# Altium PCB DB31.PcbDoc (part 7 of 8)
Units mil, origin at the board's own origin, x right, y up, seen from the top; angles counter-clockwise.
Board outline 3236.22 x 4456.69 mil, 8 copper layers (Top Layer, MidLayer1, MidLayer2, GND-Layer5, MidLayer3, VCC, MidLayer4, Bottom Layer), stack 61.8 mil thick; 226 components, 469 nets, 1815 pads, 1562 vias.
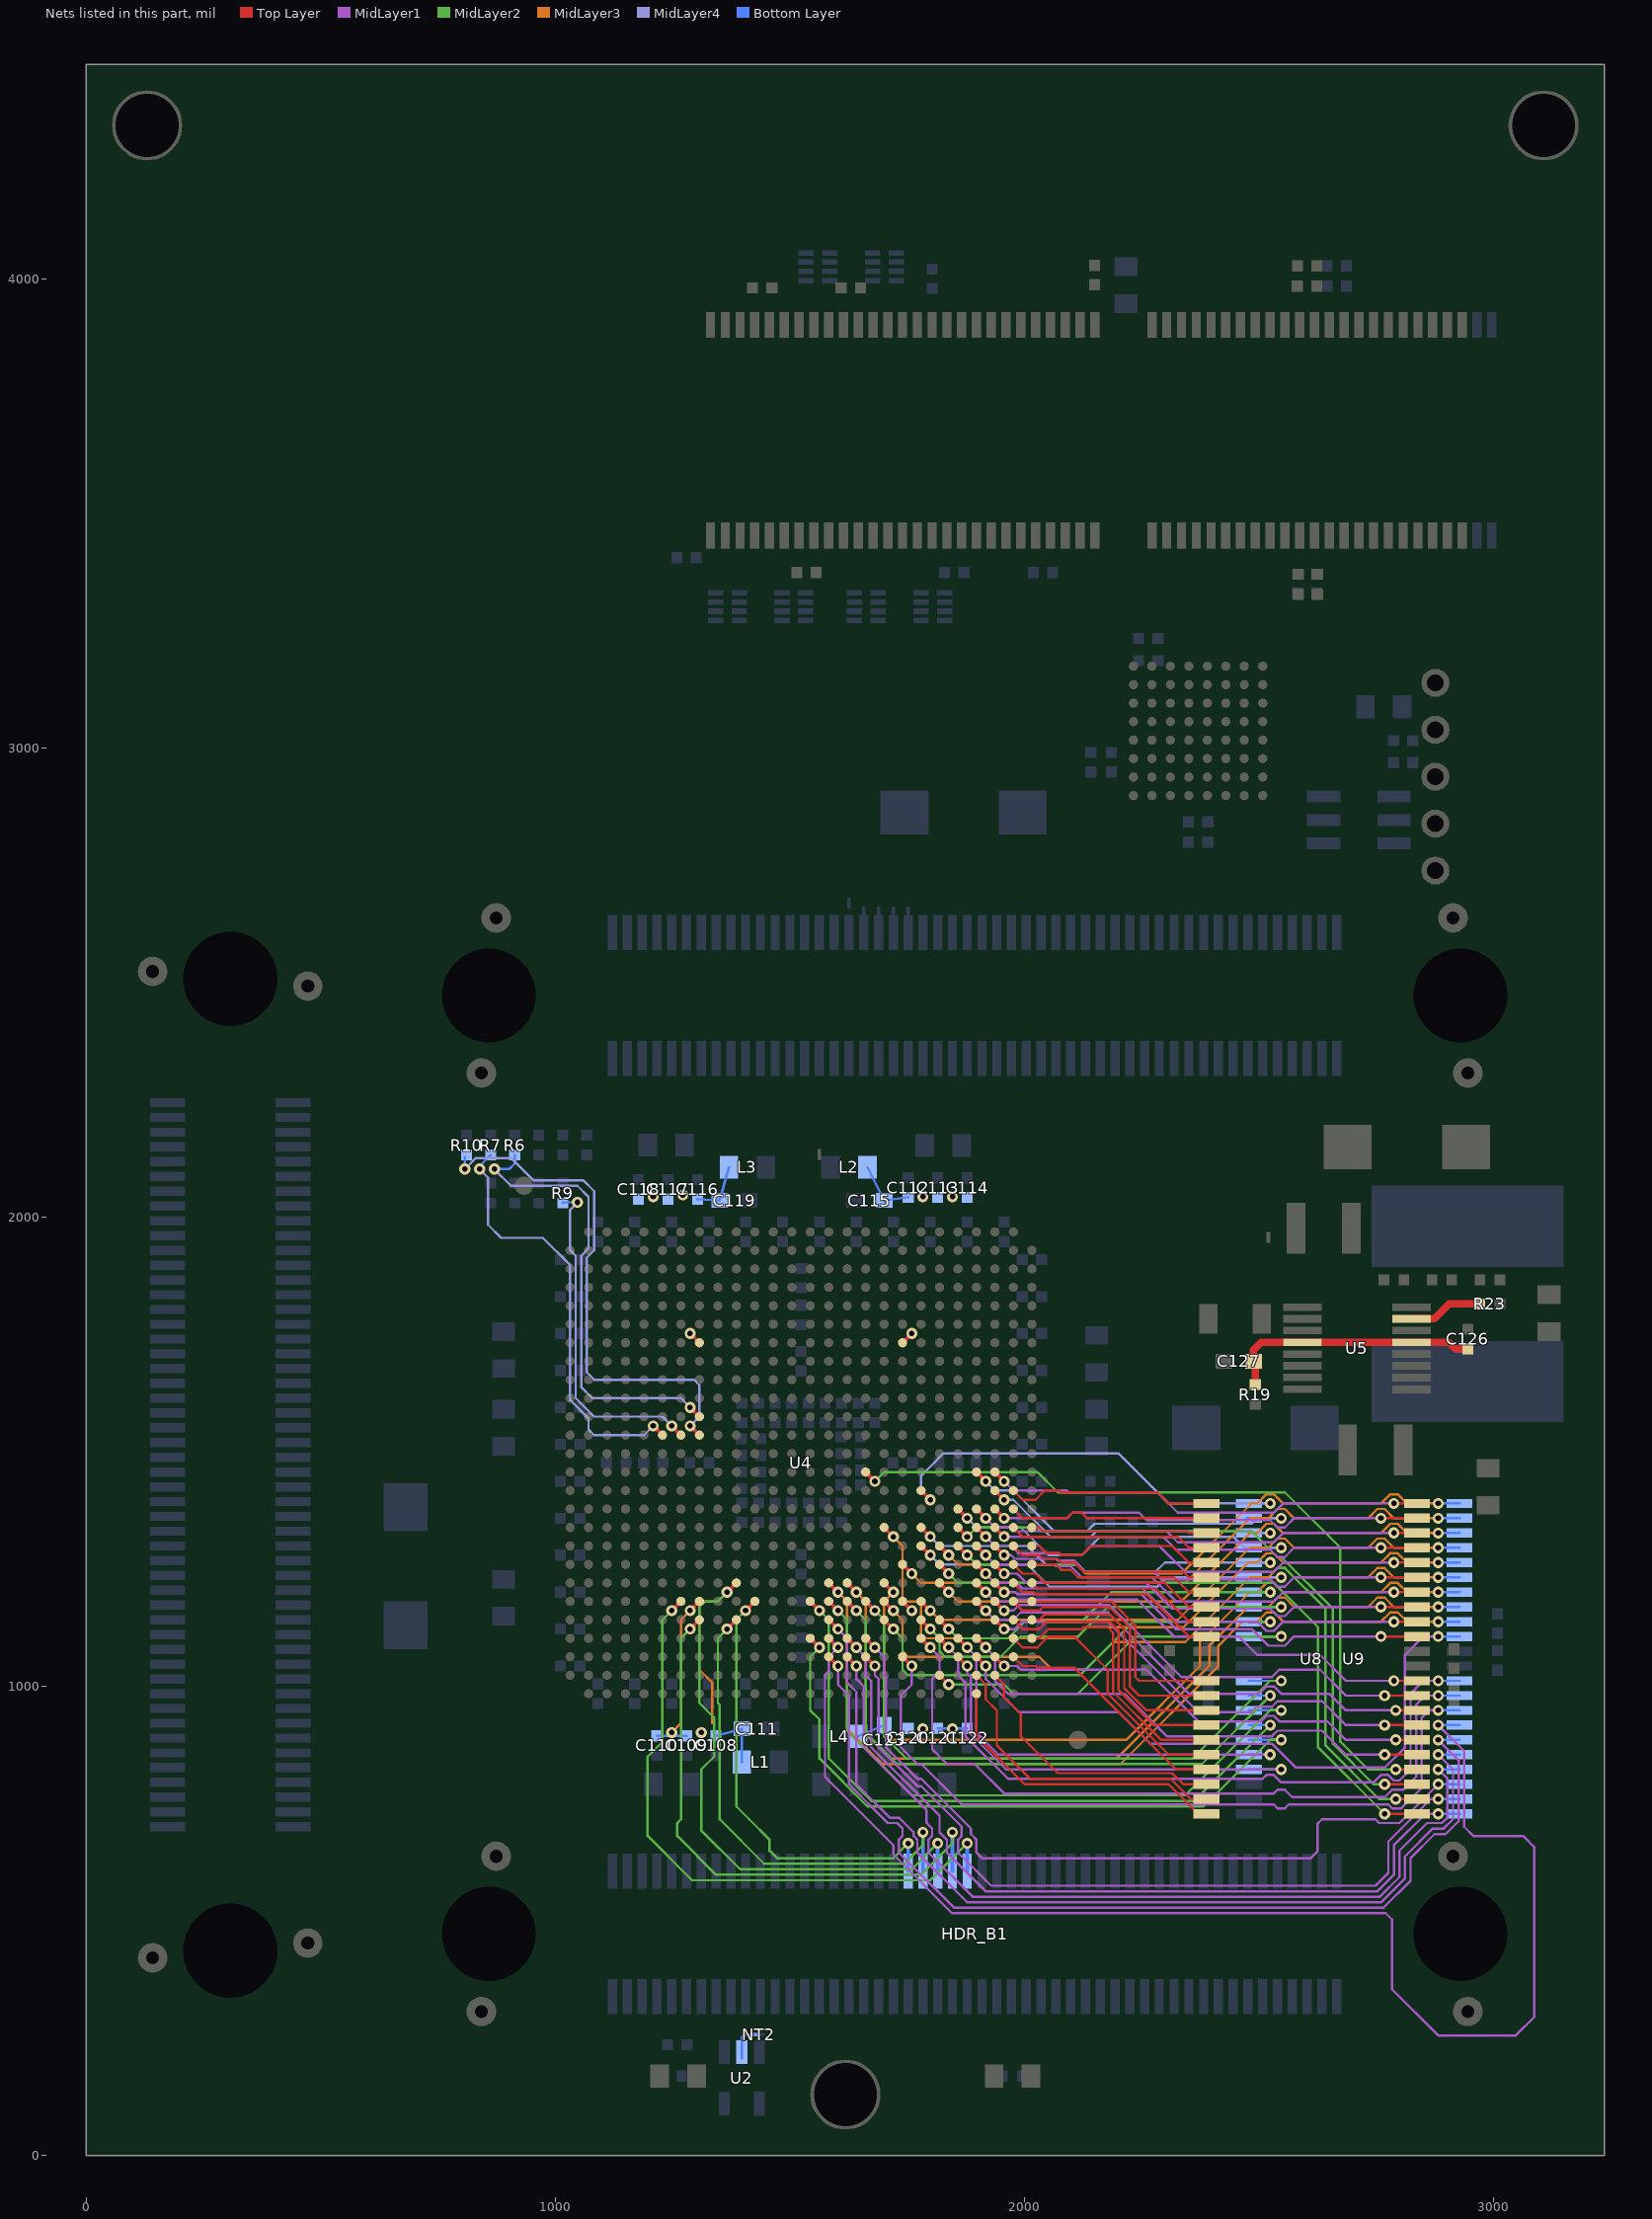
[diagram p13: the nets of this part, all layers, seen from the top]

## Via types
v1: diameter 23.62, hole 11.81, Top Layer to Bottom Layer, 947 vias
v2: diameter 23.62, hole 11.81, Top Layer to Bottom Layer, tented both sides, 476 vias
v3: diameter 27.56, hole 15.75, Top Layer to Bottom Layer, 138 vias
v4: diameter 23.62, hole 11.81, Top Layer to Bottom Layer, tented top, 1 vias

## Nets (pads, with @x,y where several pads share a name; then routed paths per layer and width w, separated by ;. In a path a pad name is that pad's centre, name@x,y a point inside that pad or via, vN(x,y) a via of type N, cw(c..) or ccw(c..) an arc to the next point about the centre after c; other vN are vias at no path point) (continued)
SRAM1_A3: U4.AD22 U9.4 | length 938
  Top Layer w7.87: U4.AD22@1858.27,1062.99 v1(1877.95,1043.3)
  MidLayer1 w5: v1(1877.95,1043.3) 1877.95,1027.56 1885.83,1019.68 1885.83,921.26 1885.83,909.45 1885.83,897.64 1960.63,822.83 v1(2547.24,822.83)
  Bottom Layer w5: U9.4@2478.44,822.83 v1(2547.24,822.83)
SRAM1_A4: U4.AC22 U9.5 | length 907.8
  Top Layer w7.87: U4.AC22@1858.27,1102.36 v1(1877.96,1082.67)
  MidLayer1 w5: v1(1877.96,1082.67) 1897.64,1062.99 1897.64,921.26 1897.64,909.45 1897.64,901.57 1944.88,854.33 v1(2523.62,854.33)
  Bottom Layer w5: U9.5@2478.44,854.32 v1(2523.62,854.33)
SRAM1_A5: U4.U20 U9.18 | length 840.9
  Top Layer w7.87: U4.U20@1779.53,1338.58 v1(1799.22,1318.9)
  MidLayer4 w5: v1(1799.22,1318.9) 1818.9,1299.21 2005.91,1299.21 2045.27,1259.84 2078.74,1259.84 2090.55,1259.84 2114.17,1259.84 2129.92,1244.09 2279.53,1244.09 2299.2,1263.77 v1(2523.83,1263.77)
  Bottom Layer w5: U9.18@2478.44,1263.77 v1(2523.83,1263.77) v1@2527.77,1263.77
SRAM1_A6: U4.T22 U9.19 | length 828.6
  Top Layer w7.87: U4.T22@1858.27,1377.95 v1(1877.96,1358.27)
  MidLayer4 w5: v1(1877.96,1358.27) 1897.64,1338.58 1992.13,1338.58 2051.18,1279.53 2078.74,1279.53 2090.55,1279.53 2122.05,1279.53 2161.42,1318.9 2444.88,1318.9 2468.5,1295.28 v1(2547.24,1295.28)
  Bottom Layer w5: U9.19@2478.44,1295.27 v1(2547.24,1295.28) v1@2551.18,1295.28
SRAM1_A7: U4.R24 U9.20 | length 683.4
  Top Layer w7.87: U4.R24@1937.01,1417.32 v1(1956.7,1397.64)
  MidLayer4 w5: v1(1956.7,1397.64) 1976.38,1397.64 2055.12,1318.9 2078.74,1318.9 2090.55,1318.9 2141.73,1318.9 2153.54,1330.71 2484.25,1330.71 2488.2,1326.76 v1(2523.83,1326.76)
  Bottom Layer w5: U9.20@2478.44,1326.76 v1(2523.83,1326.76) v1@2527.77,1326.76
SRAM1_A8: U4.P23 U9.21 | length 791.9
  Top Layer w7.87: U4.P23@1897.64,1456.69 v1(1917.33,1437.01)
  MidLayer4 w5: v1(1917.33,1437.01) 1937.01,1417.32 1976.38,1417.32 2062.99,1330.71 2078.74,1330.71 2090.55,1330.71 2133.86,1330.71 2149.61,1346.46 2484.25,1346.46 2496.06,1358.27 v1(2547.24,1358.27)
  Bottom Layer w5: U9.21@2472.44,1358.27 U9.21@2478.44,1358.26 v1(2547.24,1358.27) v1@2551.18,1358.27
SRAM1_A9: U4.R20 U9.22 | length 940.5
  Top Layer w7.87: U4.R20@1779.53,1417.32 v1(1799.22,1397.64)
  MidLayer4 w5: v1(1799.22,1397.64) 1779.53,1417.32 1779.53,1448.82 1826.77,1496.06 2078.74,1496.06 2090.55,1496.06 2200.79,1496.06 2307.1,1389.75 v1(2523.83,1389.75)
  Bottom Layer w5: U9.22@2478.44,1389.75 v1(2523.83,1389.75)
SRAM1_A10: U4.V21 U9.23 | length 1229.9
  Top Layer w7.87: U4.V21@1818.9,1299.21 v1(1838.59,1279.53)
  MidLayer3 w5: v1(1838.59,1279.53) 1858.27,1259.84 2078.74,1259.84 2090.55,1259.84 2110.24,1259.84 2129.92,1240.16 2334.65,1240.16 2480.33,1385.84 2480.33,1389.75 2496.27,1389.75 2515.96,1409.44 2531.7,1409.44 2551.38,1389.76 ; 2551.18,1389.76 2551.38,1389.76 ; v1(2881.9,1389.75) 2814.97,1389.75 2795.28,1409.45 2779.53,1409.45 2759.84,1389.76 2551.38,1389.76
  Bottom Layer w5: v1(2881.9,1389.75) U9.23@2927.25,1389.75
SRAM1_A11: U4.W19 U9.24 | length 1292.8
  Top Layer w7.87: U4.W19@1740.16,1259.84 v1(1759.84,1240.16)
  MidLayer3 w5: v1@1760.03,1239.97 1779.53,1220.47 2078.74,1220.47 2090.55,1220.47 2342.52,1220.47 2480.31,1358.27 2519.69,1358.27 2539.37,1377.95 2555.12,1377.95 2574.8,1358.27 2732.28,1358.27 2751.97,1377.95 2767.72,1377.95 2787.41,1358.26 v1(2881.9,1358.26)
  Bottom Layer w5: v1(2881.9,1358.26) U9.24@2927.25,1358.26
SRAM1_A12: U4.Y21 U9.25 | length 1217.6
  Top Layer w7.87: U4.Y21@1818.9,1220.47 v1(1838.58,1200.78)
  MidLayer3 w5: v1(1838.58,1200.78) 1858.27,1181.1 2078.74,1181.1 2090.55,1181.1 2334.67,1181.1 2480.33,1326.76 2496.27,1326.76 2515.96,1346.45 2531.7,1346.45 2551.38,1326.77 2759.84,1326.77 2779.53,1346.46 2795.28,1346.46 2814.97,1326.76 v1(2881.9,1326.76)
  Bottom Layer w5: v1(2881.9,1326.76) U9.25@2927.25,1326.76
SRAM1_A13: U4.AA20 U9.26 | length 1260.3
  Top Layer w7.87: U4.AA20@1779.53,1181.1 v1(1799.22,1161.41)
  MidLayer3 w5: v1(1799.22,1161.41) 1818.9,1141.73 2078.74,1141.73 2090.55,1141.73 2326.77,1141.73 2480.31,1295.28 2519.69,1295.28 2539.37,1314.96 2555.12,1314.96 2574.8,1295.28 2732.28,1295.28 2751.97,1314.96 2767.72,1314.96 2787.41,1295.27 v1(2881.9,1295.27)
  Bottom Layer w5: v1(2881.9,1295.27) U9.26@2927.25,1295.27
SRAM1_A14: U4.U18 U9.27 | length 1525.3
  Top Layer w7.87: U4.U18@1700.79,1338.58 v1(1720.47,1318.9)
  MidLayer3 w5: v1(1720.47,1318.9) 1740.16,1299.21 1740.16,1188.98 1748.03,1181.1 1771.65,1181.1 1779.53,1173.23 1779.53,1110.24 1787.4,1102.36 2078.74,1102.36 2090.55,1102.36 2110.24,1102.36 2133.86,1125.98 2338.58,1125.98 2476.37,1263.77 2496.27,1263.77 2515.96,1283.45 2531.7,1283.45 2551.38,1263.78 2759.84,1263.78 2779.53,1283.46 2795.28,1283.46 2814.97,1263.77 v1(2881.9,1263.77)
  Bottom Layer w5: v1(2881.9,1263.77) U9.27@2927.25,1263.77
SRAM1_A15: U4.AC17 U9.42 | length 1700
  Top Layer w7.87: U4.AC17@1661.42,1102.36 v1(1681.1,1082.67)
  MidLayer1 w5: v1(1681.1,1082.67) 1700.79,1062.99 1700.79,1023.62 1704.72,1019.68 1704.72,921.26 1704.72,909.45 1704.72,870.08 1771.65,803.15 1779.53,803.15 1885.83,696.85 1885.83,685.04 1897.64,673.23 1897.64,645.67 1909.45,633.86 2610.24,633.86 2624.26,647.88 2624.26,706.94 2633.86,716.54 2748.03,716.54 2755.91,708.66 2799.21,708.66 v1(2881.9,791.33)
  Bottom Layer w5: v1(2881.9,791.33) U9.42@2927.25,791.33
SRAM1_A16: U4.AD17 U9.43 | length 1724
  Top Layer w7.87: U4.AD17@1661.42,1062.99 v1(1681.1,1043.3)
  MidLayer1 w5: v1(1681.1,1043.3) 1681.1,1023.62 1688.98,1015.75 1688.98,921.26 1688.98,909.45 1688.98,870.08 1771.65,787.4 1779.53,787.4 1866.14,700.79 1866.14,681.1 1858.27,673.23 1858.27,645.67 1928.89,575.05 2748.28,575.05 2775.59,602.36 2775.59,669.29 2866.13,759.83 v1(2881.9,759.83)
  Bottom Layer w5: v1(2881.9,759.83) U9.43@2927.25,759.83
SRAM1_A17: U4.AC16 U9.44 | length 1776.8
  Top Layer w7.87: U4.AC16@1622.05,1102.36 v1(1641.73,1082.67)
  MidLayer1 w5: v1(1641.73,1082.67) 1661.42,1062.99 1661.42,1023.62 1673.23,1011.81 1673.23,921.26 1673.23,909.45 1673.23,870.08 1818.9,724.41 1818.9,688.98 1834.65,673.23 1834.65,645.67 1917.08,563.24 2752.21,563.24 2787.4,598.43 2787.4,661.42 2854.32,728.34 v1(2881.9,728.34)
  Bottom Layer w5: v1(2881.9,728.34) U9.44@2927.25,728.34
SRAM1_A18: U4.AA18 U9.28 | length 1440.2
  Top Layer w7.87: U4.AA18@1700.79,1181.1 v1(1720.47,1161.41)
  MidLayer3 w5: v1(1720.47,1161.41) 1740.16,1141.73 1740.16,1074.8 1751.97,1062.99 2031.5,1062.99 2059.05,1035.43 2078.74,1035.43 2090.55,1035.43 2129.92,1035.43 2188.98,1094.49 2342.52,1094.49 2480.31,1232.28 2519.69,1232.28 2539.37,1251.97 2555.12,1251.97 2574.8,1232.28 2732.28,1232.28 2751.97,1251.97 2767.72,1251.97 2787.41,1232.28 v1(2881.9,1232.27)
  Bottom Layer w5: v1(2881.9,1232.27) U9.28@2927.25,1232.27
SRAM1_D0: U4.AA14 U9.7 | length 1445.8
  Top Layer w7.87: U4.AA14@1543.31,1181.1 v1(1562.99,1161.41)
  MidLayer2 w5: v1(1562.99,1161.41) 1582.68,1141.73 1582.68,921.26 1582.68,909.45 1582.68,846.46 1673.23,755.91 2362.2,755.91 2523.6,917.3 v1(2523.83,917.3)
  Bottom Layer w5: U9.7@2478.44,917.31 v1(2523.83,917.3) v1@2527.77,917.3
SRAM1_D1: U4.AA15 U9.8 | length 1421.9
  Top Layer w7.87: U4.AA15@1582.68,1181.1 v1(1602.36,1161.41)
  MidLayer2 w5: v1(1602.36,1161.41) 1622.05,1141.73 1622.05,921.26 1622.05,909.45 1622.05,905.51 1759.84,767.72 2342.52,767.72 2523.62,948.82 v1(2547.24,948.82)
  Bottom Layer w5: U9.8@2478.44,948.81 v1(2547.24,948.82) v1@2551.18,948.82
SRAM1_D2: U4.AA16 U9.9 | length 1295.9
  Top Layer w7.87: U4.AA16@1622.05,1181.1 v1(1641.73,1161.41)
  MidLayer2 w5: v1(1641.73,1161.41) 1661.42,1141.73 1661.42,921.26 1661.42,909.45 1661.42,901.57 1728.35,834.65 2378.17,834.65 v1(2523.83,980.31) v1@2523.61,980.31
  Bottom Layer w5: U9.9@2478.44,980.31 v1(2523.83,980.31) v1@2527.77,980.31
SRAM1_D3: U4.AA17 U9.10 | length 1311
  Top Layer w7.87: U4.AA17@1661.42,1181.1 v1(1681.1,1161.41)
  MidLayer2 w5: v1(1681.1,1161.41) 1700.79,1141.73 1700.79,921.26 1700.79,909.45 1700.79,893.7 1748.03,846.46 2358.27,846.46 2523.62,1011.81 v1(2547.24,1011.81)
  Bottom Layer w5: U9.10@2478.44,1011.8 v1(2547.24,1011.81) v1@2551.18,1011.81
SRAM1_D4: U4.AE21 U9.13 | length 868
  Top Layer w5: U4.AE21@1818.9,1023.62 v1(1838.58,1003.94)
  MidLayer2 w5: v1(1838.58,1003.94) 1956.69,1003.94 1976.38,984.25 2078.74,984.25 2090.55,984.25 2114.17,984.25 2236.22,1106.3 v1(2547.24,1106.3)
  Bottom Layer w5: U9.13@2478.44,1106.29 v1(2547.24,1106.3) v1@2551.18,1106.3
SRAM1_D5: U4.AB18 U9.14 | length 1007.8
  Top Layer w7.87: U4.AB18@1700.79,1141.73 v1(1720.47,1122.04)
  MidLayer2 w5: v1(1720.47,1122.04) 1740.16,1102.36 1740.16,1035.43 1751.97,1023.62 2078.74,1023.62 2090.55,1023.62 2118.11,1023.62 2232.27,1137.79 v1(2523.83,1137.79)
  Bottom Layer w5: U9.14@2478.44,1137.79 v1(2523.83,1137.79) v1@2527.77,1137.79
SRAM1_D6: U4.AB20 U9.15 | length 933.2
  Top Layer w7.87: U4.AB20@1779.53,1141.73 v1(1799.21,1122.04)
  MidLayer2 w5: v1(1799.21,1122.04) 1818.9,1102.36 1818.9,1074.8 1830.71,1062.99 1948.82,1062.99 1992.13,1106.3 2078.74,1106.3 2090.55,1106.3 2114.17,1106.3 2177.17,1169.29 v1(2547.24,1169.29)
  Bottom Layer w5: U9.15@2478.44,1169.28 v1(2547.24,1169.29) v1@2551.18,1169.29
SRAM1_D7: U4.AB21 U9.16 | length 811.3
  Top Layer w7.87: U4.AB21@1818.9,1141.73 v1(1838.58,1122.04)
  MidLayer2 w5: v1(1838.58,1122.04) 1858.27,1102.36 1964.57,1102.36 2000,1137.8 2078.74,1137.8 2090.55,1137.8 2122.05,1137.8 2185.04,1200.79 v1@2523.83,1200.79
  Bottom Layer w5: U9.16@2478.44,1200.78 v1(2523.83,1200.78) v1@2527.77,1200.78
SRAM1_D8: U4.Y18 U9.29 | length 1765.9
  Top Layer w7.87: U4.Y18@1700.79,1220.47 v1(1720.47,1200.78)
  MidLayer3 w5: v1(1720.47,1200.78) 1700.79,1181.1 1700.79,921.26 1700.79,909.45 1700.79,893.7 1708.66,885.83 2216.54,885.83 2374.02,1043.31 2374.02,1094.49 2480.3,1200.78 2496.27,1200.78 2515.96,1220.46 2531.7,1220.46 2551.38,1200.79 2759.84,1200.79 2779.53,1220.47 2795.28,1220.47 2814.97,1200.78 v1(2881.9,1200.78)
  Bottom Layer w5: v1(2881.9,1200.78) U9.29@2927.25,1200.78
SRAM1_D9: U4.Y16 U9.30 | length 1817.9
  Top Layer w7.87: U4.Y16@1622.05,1220.47 v1(1641.73,1200.78)
  MidLayer3 w5: v1(1641.73,1200.78) 1661.42,1181.1 1661.42,921.26 1661.42,909.45 1661.42,897.64 1712.6,846.46 2196.85,846.46 2393.7,1043.31 2393.7,1086.61 2476.38,1169.29 2519.69,1169.29 2539.37,1188.98 2555.12,1188.98 2574.8,1169.29 2732.28,1169.29 2751.97,1188.98 2767.72,1188.98 2787.41,1169.29 v1(2881.9,1169.28)
  Bottom Layer w5: v1(2881.9,1169.28) U9.30@2927.25,1169.28
SRAM1_D10: U4.Y15 U9.31 | length 1847.1
  Top Layer w7.87: U4.Y15@1582.68,1220.47 v1(1602.36,1200.78)
  MidLayer3 w5: v1(1602.36,1200.78) 1622.05,1181.1 1622.05,921.26 1622.05,909.45 1696.85,834.65 2204.72,834.65 2413.39,1043.31 2413.39,1086.61 2464.56,1137.79 2496.27,1137.79 2515.96,1157.47 2531.7,1157.47 2551.38,1137.8 2759.84,1137.8 2779.53,1157.48 2795.28,1157.48 2814.97,1137.79 v1(2881.9,1137.79)
  Bottom Layer w5: v1(2881.9,1137.79) U9.31@2927.25,1137.79
SRAM1_D11: U4.AD23 U9.32 | length 1379
  Top Layer w7.87: U4.AD23@1897.64,1062.99 v1(1917.33,1043.3)
  MidLayer1 w5: v1(1917.33,1043.3) 1917.33,1015.75 1988.19,944.88 2078.74,944.88 2090.55,944.88 2200.79,944.88 2267.72,877.95 2527.56,877.95 2578.75,826.76 2767.71,826.76 2811.02,870.08 2811.02,1066.93 2850.39,1106.3 2858.27,1106.3 2862.59,1106.3 ; 2858.28,1106.29 v1(2881.9,1106.29)
  Bottom Layer w5: v1(2881.9,1106.29) U9.32@2927.25,1106.29
SRAM1_D12: U4.AC21 U9.35 | length 1526.1
  Top Layer w7.87: U4.AC21@1818.9,1102.36 v1(1838.59,1082.67)
  MidLayer1 w5: v1(1838.59,1082.67) 1858.27,1062.99 1858.27,1023.62 1874.02,1007.87 1874.02,921.26 1874.02,909.45 1874.02,893.7 1964.57,803.15 2507.87,803.15 2515.75,811.02 2531.5,811.02 2547.24,795.28 2744.09,795.27 2759.84,811.02 2775.6,811.02 2787.4,799.21 2799.21,799.21 2822.83,822.83 2822.83,984.25 2850.39,1011.81 2862.2,1011.81 ; 2862.21,1011.8 v1(2881.9,1011.8)
  Bottom Layer w5: v1(2881.9,1011.8) U9.35@2927.25,1011.8
SRAM1_D13: U4.AC20 U9.36 | length 1611.7
  Top Layer w7.87: U4.AC20@1779.53,1102.36 v1(1799.22,1082.67)
  MidLayer1 w5: v1(1799.22,1082.67) 1818.9,1062.99 1818.9,1031.5 1803.15,1015.75 1803.15,921.26 1803.15,909.45 1803.15,866.14 1834.65,834.65 1893.7,834.65 1956.69,771.65 2531.5,771.65 2539.37,779.53 2555.12,779.53 2570.87,763.78 2767.71,763.77 2783.46,779.52 2807.08,779.52 2834.65,807.09 2834.65,960.63 2854.33,980.32 2862.2,980.32 v1(2881.9,980.31)
  Bottom Layer w5: v1(2881.9,980.31) U9.36@2927.25,980.31
SRAM1_D14: U4.AD19 U9.37 | length 1636.3
  Top Layer w7.87: U4.AD19@1740.16,1062.99 v1(1759.84,1043.3)
  MidLayer1 w5: v1(1759.84,1043.3) 1759.84,1003.94 1736.22,980.32 1736.22,921.26 1736.22,909.45 1736.22,870.08 1772.88,833.42 1780.75,833.42 1827.76,786.42 1866.14,748.03 2531.5,748.03 2539.37,740.16 2555.12,740.16 2562.99,748.03 2775.59,748.03 2783.46,740.16 2803.15,740.16 2846.46,783.46 2846.46,933.07 2862.2,948.82 v1(2881.9,948.81)
  Bottom Layer w5: v1(2881.9,948.81) U9.37@2927.25,948.81
SRAM1_D15: U4.AC15 U9.38 | length 2984.3
  Top Layer w7.87: U4.AC15@1582.68,1102.36 v1(1602.36,1082.67)
  MidLayer1 w5: v1(1602.36,1082.67) 1582.68,1062.99 1582.68,1031.5 1574.8,1023.62 1574.8,921.26 1574.8,909.45 1574.8,807.09 1720.47,661.42 1720.47,641.73 1845.47,516.73 2769.68,516.73 2783.46,502.95 2783.46,354.33 2881.89,255.91 3047.24,255.91 3086.61,295.28 3086.61,657.48 3062.99,681.1 2956.69,681.1 2937.01,700.79 2937.01,862.2 v1(2881.9,917.31)
  Bottom Layer w5: v1(2881.9,917.31) U9.38@2927.25,917.31
SRAM1_NBHE: U4.AB15 U9.40 | length 2068.3
  Top Layer w7.87: U4.AB15@1582.68,1141.73 v1(1602.36,1122.04)
  MidLayer1 w5: v1(1602.36,1122.04) 1622.05,1102.36 1622.05,1007.87 1641.73,988.19 1641.73,921.26 1641.73,909.45 1641.73,791.34 1713.58,719.49 1733.27,719.49 1763.78,688.98 1763.78,681.1 1771.65,673.23 1771.65,645.67 1877.21,540.11 2760.58,540.11 2811.02,590.55 2811.02,637.79 2870.08,696.85 2893.7,696.85 2913.39,716.54 2913.39,822.83 v1(2881.9,854.32)
  Bottom Layer w5: v1(2881.9,854.32) U9.40@2927.25,854.32
SRAM1_NBLE: U4.AD15 U9.39 | length 2079.8
  Top Layer w7.87: U4.AD15@1582.68,1062.99 v1(1602.36,1043.3)
  MidLayer1 w5: v1(1602.36,1043.3) 1602.36,1003.93 1620.15,986.15 1625.98,980.31 1625.98,921.26 1625.98,909.45 1625.98,791.34 1708.66,708.66 1728.35,708.66 1740.16,696.85 1740.16,681.1 1732.28,673.23 1732.28,645.67 1849.41,528.54 2765.75,528.54 2822.83,585.63 2822.83,633.86 2874.02,685.04 2897.64,685.04 2925.2,712.6 2925.2,842.52 v1(2881.9,885.82)
  Bottom Layer w5: v1(2881.9,885.82) U9.39@2927.25,885.82
SRAM1_NCS: U4.AC14 U9.6 | length 1438.5
  Top Layer w7.87: U4.AC14@1543.31,1102.36 v1(1562.99,1082.67)
  MidLayer2 w5: v1(1562.99,1082.67) 1543.31,1062.99 1543.31,948.82 1562.99,929.13 1562.99,921.26 1562.99,909.45 1562.99,846.46 1665.35,744.09 2381.89,744.09 2523.62,885.83 v1(2547.24,885.83)
  Bottom Layer w5: U9.6@2478.44,885.82 v1(2547.24,885.83) v1@2551.18,885.83
SRAM1_NOE: U4.AD16 U9.41 | length 1899.5
  Top Layer w7.87: U4.AD16@1622.05,1062.99 v1(1641.73,1043.3)
  MidLayer1 w5: v1(1641.73,1043.3) 1641.74,1015.75 1657.48,1000 1657.48,921.26 1657.48,909.45 1657.48,870.08 1791.34,736.22 1791.34,708.66 1799.21,700.79 1803.15,696.85 1803.15,681.1 1795.28,673.23 1795.28,645.67 1889.27,551.67 2757.38,551.67 2799.21,593.5 2799.21,649.61 2858.27,708.66 2889.76,708.66 2901.57,720.47 2901.57,803.15 v1(2881.9,822.83)
  Bottom Layer w5: v1(2881.9,822.83) U9.41@2927.25,822.83
SRAM1_NWE: U4.V20 U9.17 | length 884.5
  Top Layer w7.87: U4.V20@1779.53,1299.21 v1(1799.22,1279.53)
  MidLayer4 w5: v1(1799.22,1279.53) 1818.9,1259.84 2005.91,1259.84 2053.15,1212.6 2078.74,1212.6 2090.55,1212.6 2283.46,1212.6 2303.15,1232.28 v1(2547.24,1232.28)
  Bottom Layer w5: U9.17@2478.44,1232.28 v1(2547.24,1232.28) v1@2551.18,1232.28
SRAM2_A0: U4.W21 U8.1 | length 1387.9
  Top Layer w5: v1(2767.69,728.34) U8.1@2836.71,728.34
  Top Layer w7.87: U4.W21@1818.9,1259.84 v1(1838.59,1240.16)
  MidLayer2 w5: v1(1838.59,1240.16) 1858.27,1220.47 2078.74,1220.47 2090.55,1220.47 2531.5,1220.47 2625.98,1125.98 2625.98,870.08 v1(2767.69,728.34)
SRAM2_A1: U4.V22 U8.2 | length 1379
  Top Layer w5: v1(2791.34,759.84) U8.2@2836.71,759.83
  Top Layer w7.87: U4.V22@1858.27,1299.21 v1(1877.96,1279.53)
  MidLayer2 w5: v1(1877.96,1279.53) 1897.64,1259.84 2078.74,1259.84 2090.55,1259.84 2114.17,1259.84 2129.92,1244.09 2531.5,1244.09 2539.37,1251.97 2555.12,1251.97 2641.73,1165.35 2641.73,874.02 2755.91,759.84 v1(2791.34,759.84)
SRAM2_A2: U4.U22 U8.3 | length 1389.8
  Top Layer w5: v1(2767.69,791.34) U8.3@2836.71,791.33
  Top Layer w7.87: U4.U22@1858.27,1338.58 v1(1877.96,1318.9)
  MidLayer2 w5: v1(1877.96,1318.9) 1897.64,1338.58 2025.59,1338.58 2033.47,1330.71 2078.74,1330.71 2090.55,1330.71 2484.25,1330.71 2539.37,1275.59 2547.24,1275.59 2657.48,1165.35 2657.48,877.95 2744.1,791.34 v1(2767.69,791.34)
SRAM2_A3: U4.P17 U8.4 | length 1696.3
  Top Layer w5: v1(2791.34,822.83) U8.4@2836.71,822.83
  Top Layer w7.87: U4.P17@1661.42,1456.69 v1(1681.1,1437.01)
  MidLayer2 w5: v1(1681.1,1437.01) 1700.79,1456.69 2027.56,1456.69 2070.87,1413.39 2078.74,1413.39 2090.55,1413.39 2555.12,1413.39 2673.23,1295.28 2673.23,881.89 2732.28,822.83 v1(2791.34,822.83)
SRAM2_A4: U4.AC23 U8.5 | length 1101.6
  Top Layer w5: v1(2767.69,854.33) U8.5@2836.71,854.32
  Top Layer w7.87: U4.AC23@1897.64,1102.36 v1(1917.33,1082.67)
  MidLayer1 w5: v1@2759.84,854.31 2685.04,854.31 2633.86,905.51 2539.37,905.51 2527.56,893.7 2303.15,893.7 2212.6,984.25 2090.55,984.25 2078.74,984.25 1964.57,984.25 1937.01,1011.81 1937.01,1062.99 ; 1937.01,1062.99 v1(1917.33,1082.67) 1937.01,1062.99
SRAM2_A5: U4.U23 U8.18 | length 1002.7
  Top Layer w5: v1@2787.4,1263.77 U8.18@2836.71,1263.77
  Top Layer w7.87: U4.U23@1897.64,1338.58 v1(1917.33,1318.9)
  MidLayer1 w5: v1(1917.33,1318.9) 1937.01,1299.21 1972.44,1299.21 1988.19,1283.46 2074.8,1283.46 2078.74,1279.53 2090.55,1279.53 2122.05,1279.53 2141.73,1299.21 2287.4,1299.21 2342.52,1244.09 2531.5,1244.09 2551.18,1263.78 v1(2787.4,1263.78)
SRAM2_A6: U4.U24 U8.19 | length 933.9
  Top Layer w5: v1(2759.84,1295.28) U8.19@2836.71,1295.27
  Top Layer w7.87: U4.U24@1937.01,1338.58 v1(1956.7,1318.9)
  MidLayer1 w5: v1(1956.7,1318.9) 2078.74,1318.9 2090.55,1318.9 2295.28,1318.9 2322.83,1291.34 2523.62,1291.34 2539.37,1275.59 2555.12,1275.59 2574.8,1295.28 v1(2759.84,1295.28)
SRAM2_A7: U4.T23 U8.20 | length 976.6
  Top Layer w5: v1(2787.4,1326.77) U8.20@2836.71,1326.76
  Top Layer w7.87: U4.T23@1897.64,1377.95 v1(1917.33,1358.27)
  MidLayer1 w5: v1(1917.33,1358.27) 1937.01,1338.58 1972.44,1338.58 1980.32,1330.71 2078.74,1330.71 2090.55,1330.71 2303.15,1330.71 2326.77,1307.09 2531.5,1307.09 2551.18,1326.77 v1(2787.4,1326.77)
SRAM2_A8: U4.T24 U8.21 | length 933.9
  Top Layer w5: v1(2759.84,1358.27) U8.21@2836.71,1358.26
  Top Layer w7.87: U4.T24@1937.01,1377.95 v1(1956.7,1358.27)
  MidLayer1 w5: v1(1956.7,1358.27) 2078.74,1358.27 2090.55,1358.27 2102.36,1370.08 2244.09,1370.08 2259.84,1354.33 2523.62,1354.33 2539.37,1338.58 2555.12,1338.58 2574.8,1358.27 v1(2759.84,1358.27)
SRAM2_A9: U4.P24 U8.22 | length 943.7
  Top Layer w5: v1(2787.4,1389.76) U8.22@2836.71,1389.76
  Top Layer w7.87: U4.P24@1937.01,1456.69 v1(1956.7,1437.01)
  MidLayer1 w5: v1(1956.7,1437.01) 1976.38,1417.32 2078.74,1417.32 2090.55,1417.32 2094.49,1413.39 2283.46,1413.39 2326.77,1370.08 2531.5,1370.08 2551.18,1389.76 v1(2787.4,1389.76)
SRAM2_A10: U4.R25 U8.23 | length 439.2
  Top Layer w5: U4.R25@1976.38,1417.32 1996.06,1397.64 2023.62,1397.64 2043.31,1417.32 2074.8,1417.32 2078.74,1413.39 2090.55,1413.39 2283.46,1413.39 2307.1,1389.76 U8.23@2387.89,1389.76
SRAM2_A11: U4.T25 U8.24 | length 429.5
  Top Layer w5: U4.T25@1976.38,1377.95 1996.07,1358.27 2078.74,1358.27 2090.55,1358.27 2102.36,1370.08 2122.05,1370.08 2133.87,1358.26 U8.24@2387.89,1358.26
SRAM2_A12: U4.U26 U8.25 | length 377
  Top Layer w5: U4.U26@2015.75,1338.58 2031.5,1338.58 2039.37,1330.71 2078.74,1330.71 2090.55,1330.71 2346.46,1330.71 2350.4,1326.76 U8.25@2387.89,1326.76
SRAM2_A13: U4.U25 U8.26 | length 429.5
  Top Layer w5: U4.U25@1976.38,1338.58 1996.06,1318.9 2078.74,1318.9 2090.55,1318.9 2326.77,1318.9 2350.4,1295.27 U8.26@2387.89,1295.27
SRAM2_A14: U4.V26 U8.27 | length 403.1
  Top Layer w5: U4.V26@2015.75,1299.21 2031.5,1299.21 2047.24,1283.46 2074.8,1283.46 2078.74,1279.53 2090.55,1279.53 2122.05,1279.53 2141.73,1299.21 2314.96,1299.21 2350.4,1263.77 U8.27@2387.89,1263.77
SRAM2_A15: U4.AE24 U8.42 | length 590.9
  Top Layer w5: U4.AE24@1937.01,1023.62 1956.69,1003.94 1956.69,976.38 1992.13,940.95 1992.13,921.26 1992.13,909.45 1992.13,893.7 2070.87,814.96 2314.96,814.96 2338.59,791.33 U8.42@2387.89,791.33
SRAM2_A16: U4.AE23 U8.43 | length 661.8
  Top Layer w5: U4.AE23@1897.64,1023.62 1917.32,1003.94 1917.32,972.44 1940.94,948.82 1940.94,921.26 1940.94,909.45 1940.94,874.02 2011.81,803.15 2311.02,803.15 2354.34,759.83 U8.43@2387.89,759.83
SRAM2_A17: U4.AF23 U8.44 | length 649.3
  Top Layer w5: U4.AF23@1897.64,984.25 1897.64,921.26 1897.64,909.45 1897.64,893.7 2000,791.34 2307.09,791.34 2370.09,728.34 U8.44@2387.89,728.34
SRAM2_A18: U4.V25 U8.28 | length 439.2
  Top Layer w5: U4.V25@1976.38,1299.21 1996.06,1279.53 2031.5,1279.53 2039.37,1271.65 2070.87,1271.65 2078.74,1263.78 2090.55,1263.78 2106.3,1263.78 2125.98,1244.09 2338.58,1244.09 2350.4,1232.28 U8.28@2387.89,1232.28
SRAM2_D0: U4.AB24 U8.7 | length 1017.6
  Top Layer w5: v1(2767.69,917.32) U8.7@2836.71,917.32
  Top Layer w7.87: U4.AB24@1937.01,1141.73 v1(1956.7,1122.04)
  MidLayer1 w5: v1(1956.7,1122.04) 1980.31,1122.04 1996.06,1137.8 2078.74,1137.8 2094.49,1137.8 2177.17,1137.8 2370.08,944.88 2482.35,944.88 2494.16,956.69 2527.58,956.69 2539.11,968.23 2539.11,968.5 2633.86,968.5 2685.06,917.3 v1@2759.84,917.3
SRAM2_D1: U4.AA23 U8.8 | length 1057.4
  Top Layer w5: v1(2791.34,948.82) U8.8@2836.71,948.81
  Top Layer w7.87: U4.AA23@1897.64,1181.1 v1(1917.33,1161.41)
  MidLayer1 w5: v1(1917.33,1161.41) 1937.01,1141.73 1976.38,1141.73 1992.13,1157.48 2078.74,1157.48 2094.49,1157.48 2177.17,1157.48 2350.39,984.25 2500,984.25 2515.75,1000 2531.5,1000 2547.24,984.25 2649.61,984.25 2685.04,948.83 v1@2787.41,948.83
SRAM2_D2: U4.AA24 U8.9 | length 997.9
  Top Layer w5: v1(2767.69,980.31) U8.9@2836.71,980.31
  Top Layer w7.87: U4.AA24@1937.01,1181.1 v1(1956.7,1161.41)
  MidLayer1 w5: v1(1956.7,1161.41) 1976.38,1161.42 1988.19,1173.23 2078.74,1173.23 2090.55,1173.23 2181.1,1173.23 2334.65,1019.68 2527.56,1019.68 2543.31,1035.43 2629.92,1035.43 2685.04,980.32 ; 2685.04,980.29 v1@2759.84,980.29
SRAM2_D3: U4.Y23 U8.10 | length 1028.8
  Top Layer w5: v1(2787.4,1011.81) U8.10@2836.71,1011.8
  Top Layer w7.87: U4.Y23@1897.64,1220.47 v1(1917.33,1200.78)
  MidLayer1 w5: v1(1917.33,1200.78) 1937.01,1181.1 1976.38,1181.1 1980.32,1185.04 2078.74,1185.04 2090.55,1185.04 2240.16,1185.04 2318.9,1106.3 2456.69,1106.3 2496.06,1066.93 2629.92,1066.93 2685.03,1011.82 v1(2787.4,1011.81)
SRAM2_D4: U4.Y24 U8.13 | length 963.3
  Top Layer w5: v1(2759.84,1106.3) U8.13@2836.71,1106.29
  Top Layer w7.87: U4.Y24@1937.01,1220.47 v1(1956.7,1200.78)
  MidLayer1 w5: v1(1956.7,1200.78) 1980.32,1200.79 1984.25,1196.85 2078.74,1196.85 2090.55,1196.85 2248.03,1196.85 2322.83,1122.05 2484.25,1122.05 2519.68,1086.62 2555.11,1086.62 2574.79,1106.31 v1(2759.84,1106.3)
SRAM2_D5: U4.W23 U8.14 | length 1005.9
  Top Layer w5: v1(2787.4,1137.8) U8.14@2836.71,1137.79
  Top Layer w7.87: U4.W23@1897.64,1259.84 v1(1917.33,1240.16)
  MidLayer1 w5: v1(1917.33,1240.16) 1937.01,1220.47 1984.25,1220.47 1996.06,1208.66 2078.74,1208.66 2090.55,1208.66 2251.97,1208.66 2322.83,1137.8 2496.06,1137.8 2515.75,1118.11 2531.49,1118.11 2551.17,1137.8 ; 2551.17,1137.8 v1(2787.4,1137.8)
SRAM2_D6: U4.W24 U8.15 | length 953.5
  Top Layer w5: v1(2759.84,1169.29) U8.15@2836.71,1169.28
  Top Layer w7.87: U4.W24@1937.01,1259.84 v1(1956.7,1240.16)
  MidLayer1 w5: v1(1956.7,1240.16) 1984.26,1240.16 2003.94,1220.47 2078.74,1220.47 2090.55,1220.47 2259.84,1220.47 2314.95,1165.36 2523.61,1165.36 2539.36,1149.61 2555.11,1149.61 2574.79,1169.3 v1(2759.84,1169.29)
SRAM2_D7: U4.V23 U8.16 | length 996.1
  Top Layer w5: v1(2787.4,1200.79) U8.16@2836.71,1200.78
  Top Layer w7.87: U4.V23@1897.64,1299.21 v1(1917.33,1279.53)
  MidLayer1 w5: v1(1917.33,1279.53) 1937.01,1259.84 2062.99,1259.84 2066.93,1255.91 2078.74,1255.91 2090.55,1255.91 2098.43,1255.91 2122.05,1232.28 2271.65,1232.28 2322.83,1181.1 2531.49,1181.1 ; 2531.49,1181.11 2551.17,1200.8 ; 2551.17,1200.8 v1(2787.4,1200.79)
SRAM2_D8: U4.W26 U8.29 | length 396.6
  Top Layer w5: U4.W26@2015.75,1259.84 2066.93,1259.84 2078.74,1248.03 2090.55,1248.03 2098.43,1248.03 2114.17,1232.28 2318.9,1232.28 2350.4,1200.78 U8.29@2387.89,1200.78
SRAM2_D9: U4.W25 U8.30 | length 449
  Top Layer w5: U4.W25@1976.38,1259.84 1996.06,1240.16 2023.62,1240.16 2043.31,1220.47 2078.74,1220.47 2090.55,1220.47 2299.21,1220.47 2350.4,1169.28 U8.30@2387.89,1169.28
SRAM2_D10: U4.Y26 U8.31 | length 406.4
  Top Layer w5: U4.Y26@2015.75,1220.47 2027.56,1208.66 2078.74,1208.66 2090.55,1208.66 2279.53,1208.66 2350.4,1137.79 U8.31@2387.89,1137.79
SRAM2_D11: U4.Y25 U8.32 | length 458.8
  Top Layer w5: U4.Y25@1976.38,1220.47 1996.06,1200.79 2019.68,1200.79 2023.62,1196.85 2078.74,1196.85 2090.55,1196.85 2259.84,1196.85 2350.4,1106.29 U8.32@2387.89,1106.29
SRAM2_D12: U4.AA26 U8.35 | length 506.8
  Top Layer w5: U4.AA26@2015.75,1181.1 2078.74,1181.1 2090.55,1181.1 2185.04,1181.1 2236.22,1129.92 2236.22,1019.68 2244.1,1011.8 U8.35@2387.89,1011.8
SRAM2_D13: U4.AA25 U8.36 | length 575
  Top Layer w5: U4.AA25@1976.38,1181.1 1996.06,1161.42 2031.5,1161.42 2039.37,1169.29 2078.74,1169.29 2090.55,1169.29 2181.1,1169.29 2224.41,1125.99 2224.41,1000 2244.1,980.31 U8.36@2387.89,980.31
SRAM2_D14: U4.AB26 U8.37 | length 535.6
  Top Layer w5: U4.AB26@2015.75,1141.73 2031.5,1141.73 2043.31,1153.54 2078.74,1153.54 2090.55,1153.54 2181.1,1153.54 2212.6,1122.05 2212.6,996.06 2259.85,948.81 U8.37@2387.89,948.81
SRAM2_D15: U4.AB25 U8.38 | length 591.3
  Top Layer w5: U4.AB25@1976.38,1141.73 1996.06,1122.05 2031.5,1122.05 2047.24,1137.8 2078.74,1137.8 2090.55,1137.8 2181.1,1137.8 2200.79,1118.11 2200.79,992.13 2275.6,917.32 U8.38@2387.89,917.32
SRAM2_NBHE: U4.AC25 U8.40 | length 563.8
  Top Layer w5: U4.AC25@1976.38,1102.36 1996.06,1082.68 2027.56,1082.68 2051.18,1106.3 2078.74,1106.3 2090.55,1106.3 2106.3,1106.3 2118.11,1094.49 2177.17,1035.43 2177.17,984.25 2307.09,854.32 U8.40@2387.89,854.32
SRAM2_NBLE: U4.AC26 U8.39 | length 555.2
  Top Layer w5: U4.AC26@2015.75,1102.36 2031.49,1102.36 2051.18,1122.05 2078.74,1122.05 2090.55,1122.05 2122.05,1122.05 2125.98,1125.98 2177.17,1125.98 2188.98,1114.17 2188.98,988.19 2291.35,885.82 U8.39@2387.89,885.82
SRAM2_NCS: U4.AD24 U8.6 | length 978.9
  Top Layer w5: v1(2791.34,885.83) U8.6@2836.71,885.82
  Top Layer w7.87: U4.AD24@1937.01,1062.99 v1(1956.7,1043.3)
  MidLayer1 w5: v1(1956.7,1043.3) 1984.25,1043.31 1992.12,1035.43 2078.74,1035.43 2090.55,1035.43 2259.84,1035.43 2370.08,925.2 2503.93,925.2 2515.75,937.01 2531.5,937.01 2543.31,925.2 2645.67,925.2 2685.03,885.83 v1@2787.41,885.83
SRAM2_NOE: U4.AD25 U8.41 | length 511
  Top Layer w5: U4.AD25@1976.38,1062.99 1996.06,1043.31 2023.62,1043.31 2027.56,1039.37 2078.74,1039.37 2090.55,1039.37 2106.3,1039.37 2322.84,822.83 U8.41@2387.89,822.83
SRAM2_NWE: U4.V24 U8.17 | length 943.7
  Top Layer w5: v1(2759.84,1232.28) U8.17@2836.71,1232.28
  Top Layer w7.87: U4.V24@1937.01,1299.21 v1(1956.7,1279.53)
  MidLayer1 w5: v1(1956.7,1279.53) 1971.46,1279.53 1979.33,1271.66 2066.93,1271.66 2070.87,1267.72 2078.74,1267.72 2090.55,1267.72 2106.3,1267.72 2129.92,1244.09 2275.59,1244.09 2291.33,1228.35 2523.61,1228.35 2539.36,1212.61 2555.11,1212.61 2574.79,1232.29 v1(2759.84,1232.28)
STATUS_LED: NT2.1 U2.2 | length 74.3
  Bottom Layer w5: U2.2@1397.64,207.68 U2.2@1397.64,220.47 1397.64,251.97 1403.54,257.87 NT2.1@1425.2,257.87
SW0: HDR_B1.42 U4.AA11 | length 951.1
  Top Layer w7.87: v1(1405.51,1161.41) U4.AA11@1425.2,1181.1
  MidLayer2 w5: v1(1405.51,1161.41) 1385.83,1141.73 1385.83,921.26 1385.83,909.45 1385.83,744.09 1413.39,716.54 1456.69,673.23 1456.69,649.61 1472.44,633.86 1720.47,633.86 v2(1751.97,665.35)
  Bottom Layer w7.87: HDR_B1.42@1751.97,606.3 v2(1751.97,665.35)
SW1: HDR_B1.44 U4.AB10 | length 1041.9
  Top Layer w7.87: v1(1366.14,1122.04) U4.AB10@1385.83,1141.73
  MidLayer2 w5: v1(1366.14,1122.04) 1346.46,1102.36 1346.46,964.56 1350.39,960.63 1350.39,921.26 1350.39,909.45 1350.39,716.54 1444.88,622.05 1744.09,622.05 1783.46,661.42 v2(1783.46,688.98)
  Bottom Layer w7.87: HDR_B1.44@1783.47,606.3 v2(1783.46,688.98)
SW2: HDR_B1.46 U4.Y10 | length 1552.4
  Top Layer w7.87: v1(1366.14,1200.78) U4.Y10@1385.83,1220.47
  MidLayer2 w5: v1(1366.14,1200.78) 1346.46,1181.1 1318.9,1181.1 1307.09,1169.29 1307.09,964.57 1338.58,933.07 1338.58,921.26 1338.58,909.45 1338.58,850.39 1311.02,822.83 1311.02,692.91 1393.7,610.24 1759.84,610.24 v2(1814.96,665.35)
  MidLayer3 w5: 1334.64,921.26 1334.64,1007.87 1307.09,1035.43 1307.09,1169.29 1318.9,1181.1 1346.46,1181.1 v1(1366.14,1200.78)
  Bottom Layer w7.87: HDR_B1.46@1814.96,606.3 v2(1814.96,665.35)
SW3: HDR_B1.48 U4.AB8 | length 1235.1
  Top Layer w7.87: v1(1287.4,1122.04) U4.AB8@1307.09,1141.73
  MidLayer2 w5: v1(1287.4,1122.04) 1267.72,1102.36 1267.72,921.26 1267.72,909.45 1267.72,716.54 1259.84,708.66 1259.84,681.1 1342.52,598.43 1779.53,598.43 1846.46,665.35 v2(1846.46,688.98)
  Bottom Layer w7.87: HDR_B1.48@1846.46,606.3 v2(1846.46,688.98)
SW4: HDR_B1.50 U4.AA7 | length 1341.3
  Top Layer w7.87: v1(1248.03,1161.41) U4.AA7@1267.72,1181.1
  MidLayer2 w5: v1(1248.03,1161.41) 1228.35,1141.73 1228.35,921.26 1228.35,909.45 1228.35,881.89 1196.85,850.39 1196.85,681.1 1291.34,586.61 1799.21,586.61 v2(1877.95,665.35)
  Bottom Layer w7.87: HDR_B1.50@1877.96,606.3 v2(1877.95,665.35)
TCK: R7.2 U4.M6 | length 921.8
  Top Layer w7.87: v1(1208.66,1555.12) U4.M6@1228.35,1535.43
  MidLayer4 w5: v1(838.58,2102.36) 856.75,2084.19 856.75,1983.59 884.44,1955.9 973.23,1955.9 1031.5,1897.64 1031.5,1610.24 1070.87,1570.87 1070.87,1547.24 1082.68,1535.43 1188.98,1535.43 v1(1208.66,1555.12)
  Bottom Layer w5: v1(838.58,2102.36) 838.58,2108.74 R7.2@862.2,2132.36
TDI: R10.2 U4.M8 | length 1107.3
  Top Layer w7.87: v1(1287.4,1555.12) U4.M8@1307.09,1535.43
  MidLayer4 w5: v1(807.09,2102.36) 830.71,2125.98 905.51,2125.98 952.76,2078.74 1059.06,2078.74 1082.68,2055.12 1082.68,1929.13 1066.93,1913.39 1066.93,1669.29 1082.68,1653.54 1295.28,1653.54 1307.09,1641.73 1307.09,1574.8 v1(1287.4,1555.12)
  Bottom Layer w5: v1(807.09,2102.36) R10.2@807.09,2128.42
TDO: R9.2 U4.M7 | length 717.9
  Top Layer w7.87: v1(1248.03,1555.12) U4.M7@1267.72,1535.43
  MidLayer4 w5: v1(1047.24,2031.5) 1031.5,2015.75 1031.5,1929.13 1043.31,1917.32 1043.31,1614.17 1082.68,1574.8 1228.35,1574.8 v1(1248.03,1555.12)
  Bottom Layer w5: R9.2@1015.75,2030 1017.25,2031.5 v1(1047.24,2031.5)
TMS: R6.2 U4.L8 | length 981.7
  Top Layer w7.87: v1(1287.4,1594.49) U4.L8@1307.09,1574.8
  MidLayer4 w5: v1(870.08,2102.36) 905.51,2066.93 1047.24,2066.93 1070.87,2043.31 1070.87,1933.07 1055.12,1917.32 1055.12,1637.79 1078.74,1614.17 1267.72,1614.17 v1(1287.4,1594.49)
  Bottom Layer w5: v1(870.08,2102.36) 901.57,2102.36 913.38,2114.17 R6.2@913.38,2132.36
TOFF: R23.1 U5.7 | length 159.5
  Top Layer w15.75: U5.7@2824.58,1783.25 2824.8,1783.46 2874.02,1783.46 2905.51,1814.96 R23.1@2970.94,1814.96
VCCA_PLL1: C108.1 C109.1 C110.1 C111.1 L1.2 U4.AA8 | length 494.9
  Top Layer w7.87: v1(1287.4,1161.41) U4.AA8@1307.09,1181.1
  MidLayer3 w5: v1(1248.03,901.57) 1267.72,921.26 1267.72,1141.73 v1(1287.4,1161.41)
  Bottom Layer w5: C110.1@1216.53,894.68 1248.03,894.68 C109.1@1279.52,894.68 ; C108.1@1342.52,894.68 C111.1@1397.63,909.45 L1.2@1397.63,838.58
  other v1: 1311.02,901.57
VCCA_PLL2: C112.1 C113.1 C114.1 C115.1 L2.2 U4.G19 | length 158.7
  Top Layer w7.87: U4.G19@1740.16,1732.28 v1(1759.84,1751.97)
  Bottom Layer w5: L2.2@1665.35,2106.29 C115.1@1700.78,2035.43 C112.1@1751.97,2042.32
  other v1: 1783.46,2043.31 1846.46,2043.31
VCCA_PLL3: C116.1 C117.1 C118.1 C119.1 L3.2 U4.G8 | length 148.7
  Top Layer w7.87: v1(1287.4,1751.97) U4.G8@1307.09,1732.28
  Bottom Layer w5: C116.1@1303.15,2038.38 C119.1@1350.39,2035.43 L3.2@1370.08,2106.29
  other v1: 1208.66,2043.31 1271.65,2047.24
VCCA_PLL4: C120.1 C121.1 C122.1 C123.1 L4.2 U4.AA19 | length 150.8
  Top Layer w7.87: U4.AA19@1740.16,1181.1 v1(1759.84,1161.41)
  Bottom Layer w5: L4.2@1645.67,893.7 C123.1@1700.78,917.32 ; C121.1@1814.96,910.43 1846.46,910.43 C122.1@1877.95,910.43
  other v1: 1783.46,909.45 1846.46,909.45
VFILT: C126.1 C127.1 R19.2 U5.5 U5.12 | length 544.3
  Top Layer w15.75: R19.2@2492.12,1643.23 2492.12,1688.98 C127.1@2488.18,1692.91 2488.19,1716.54 2504.9,1733.25 U5.12@2592.58,1733.25 ; U5.12@2592.58,1733.25 U5.5@2824.58,1733.25 2904.53,1733.27 2918.31,1719.48 C126.1@2944.88,1719.48
pads on no net: HDR_B1.93 HDR_B1.95 HDR_B1.MH5 HDR_B1.MH6 HDR_L1.MH5 HDR_L1.MH6 HDR_T1.95 HDR_T1.MH5 HDR_T1.MH6 MH1.MOUNT MH2.MOUNT MH3.MOUNT U1.5 U2.1 U3.A1 U3.A8 U3.B1 U3.B4 U3.C1 U3.D1 U3.E1 U3.F8 U3.G1 U3.G8 U3.H1 U3.H8 U4.A19 U4.AA3 U4.AA4 U4.AB3 U4.AB4 U4.AC3 U4.AC24 U4.AD3 U4.AE13 U4.B2 U4.B12 U4.B14 U4.B25 U4.C8 U4.C19 U4.C21 U4.D3 U4.D12 U4.D18 U4.E5 U4.F4 U4.F6 U4.F24 U4.FID1 U4.G23 U4.G24 U4.H10 U4.H15 U4.H16 U4.J7 U4.J9 U4.J10 U4.K16 U4.K17 U4.K18 U4.K19 U4.K26 U4.L24 U4.M22 U4.M25 U4.N18 U4.N20 U4.N21 U4.N24 U4.T7 U4.T10 U4.U7 U4.U10 U4.V3 U4.W4 U4.Y2 U4.Y3 U4.Y4 U4.Y22 U6.40 U7.40
copper on no net: | length 7320.2
  Top Layer w5: 1464.57,1929.13 1484.25,1948.82 1484.25,2011.81 ; 1724.41,2031.5 1724.41,2000 1740.16,1984.25 1740.16,1968.51 ; 1976.38,1535.43 1996.06,1555.12 2023.62,1555.12 2031.5,1562.99 ; 2015.75,1614.17 2078.74,1614.17
  Top Layer w7.87: v1(1051.18,1948.82) 1070.87,1929.13 ; v1(1090.55,1043.3) 1110.24,1062.99 ; v1(1090.55,1082.67) 1110.24,1102.36 ; v1(1090.55,1122.04) 1110.24,1141.73 ; v1(1090.55,1161.41) 1110.24,1181.1 ; v1(1090.55,1200.78) 1110.24,1220.47 ; v1(1090.55,1279.53) 1110.24,1299.21 ; v1(1090.55,1870.08) 1110.24,1850.39 ; v1(1129.92,1122.04) 1149.61,1141.73 ; v1(1129.92,1161.41) 1149.61,1181.1 ; v1(1129.92,1200.78) 1149.61,1220.47 ; v1(1129.92,1240.16) 1149.61,1259.84 ; v1(1129.92,1791.34) 1149.61,1771.65 ; v1(1169.29,1830.71) 1188.98,1811.02 ; v1(1208.66,1791.34) 1228.35,1771.65 ; v1(1248.03,1318.9) 1267.72,1338.58 ; v1(1248.03,1358.27) 1267.72,1377.95 ; v1(1248.03,1673.23) 1267.72,1653.54 ; v1(1287.4,1909.45) 1307.09,1889.76 ; v1(1444.88,1870.08) 1464.57,1850.39 ; 1582.68,1692.91 v1(1602.36,1712.6) ; 1622.05,1692.91 v1(1641.73,1712.6) ; 1661.42,1614.17 v1(1681.1,1633.86) ; 1700.79,1496.06 v1(1720.47,1515.75) ; 1700.79,1614.17 v1(1720.47,1633.86) ; 1700.79,1850.39 v1(1720.47,1870.08) ; 1740.16,1614.17 v1(1759.84,1633.86) ; 1740.16,1889.76 v1(1759.84,1909.45) ; 1779.53,1496.06 v1(1799.22,1515.75) ; 1818.9,1889.76 v1(1838.58,1909.45) ; 1858.27,1220.47 v1(1877.95,1200.78) ; 1858.27,1535.43 v1(1877.96,1555.12) ; 1937.01,1574.8 v1(1956.7,1594.49) ; 1937.01,1771.65 v1(1956.7,1791.34) ; 3149.61,4212.6 3149.61,4330.71
  MidLayer1 w5: 967.34,1175.04 1064.8,1175.04 1070.87,1181.1 1110.24,1181.1 v1(1129.92,1200.78) ; 967.75,1185.04 1051.18,1185.04 1066.93,1200.78 v1(1090.55,1200.78) ; 968.5,1023.62 1039.37,1023.62 1059.05,1043.3 v1(1090.55,1043.3) ; 968.5,1106.3 1070.87,1106.3 1074.8,1102.36 1110.24,1102.36 v1(1129.92,1122.04) ; 968.51,1122.04 v1(1090.55,1122.04) ; 968.5,1137.79 1066.93,1137.79 1070.87,1141.73 1110.24,1141.73 v1(1129.92,1161.41) ; 968.5,1153.54 1063,1153.54 1070.87,1161.41 v1(1090.55,1161.41) ; 968.5,1200.79 1043.31,1200.79 1062.99,1220.47 1110.24,1220.47 v1(1129.92,1240.16) ; 968.51,1279.53 v1(1090.55,1279.53) ; 1003.94,1062.99 1035.43,1062.99 1055.12,1082.67 v1(1090.55,1082.67) ; 1267.72,2015.75 1267.72,1956.69 1287.4,1937.01 v1(1287.4,1909.45) ; v1(1444.88,1870.08) 1464.57,1889.77 1464.57,1921.26 1476.38,1933.07 1476.38,2031.5 ; v1(1720.47,1870.08) 1740.16,1889.76 1740.16,1944.88 1728.35,1956.69 1728.35,2031.5 ; 1740.16,2031.5 1740.16,1968.5 1759.84,1948.82 v1(1759.84,1909.45) ; 1830.71,2031.5 1830.71,1937.01 1838.58,1929.13 v1(1838.58,1909.45) ; v1(1877.96,1555.12) 1897.64,1574.8 1992.13,1574.8 2031.5,1614.17 2078.74,1614.17 ; v1(1917.32,1751.97) 1937.01,1771.65 1976.38,1771.65 1992.13,1787.4 2078.74,1787.4 ; v1(1956.7,1594.49) 1984.25,1594.49 2015.75,1625.98 2078.74,1625.98 ; v1(1956.7,1791.34) 1976.38,1791.34 1984.25,1799.21 2078.74,1799.21
  MidLayer2 w5: v1(1090.55,1870.08) 1109.95,1889.48 1109.95,1920.15 ; v1(1799.22,1515.75) 1830.71,1484.25 2078.74,1484.25 ; v1(1877.95,1200.78) 1897.64,1181.1 2078.74,1181.1
  MidLayer3 w5: 1078.94,1811.02 1149.61,1811.02 v1(1169.29,1830.71) ; 1079.68,1850.39 1181.1,1850.39 1188.98,1842.52 1188.98,1811.02 v1(1208.66,1791.34)
  MidLayer4 w5: 968.51,1456.69 1338.58,1456.69 1346.46,1448.82 1346.46,1377.95 ; 1346.46,1377.95 v1(1366.14,1358.27) ; v1(1602.36,1712.6) 1582.68,1732.28 1582.68,1921.26 1653.54,1992.13 1653.54,2031.5 ; v1(1641.73,1712.6) 1622.05,1732.28 1622.05,1925.2 1669.29,1972.44 1669.29,2031.5 ; v1(1720.47,1515.75) 1740.16,1535.43 1976.38,1535.43 2035.43,1594.49 2078.74,1594.49 ; v1(1720.47,1633.86) 1720.47,1602.36 1748.03,1574.8 1972.44,1574.8 2011.81,1614.17 2078.74,1614.17 ; v1(1759.84,1633.86) 1779.53,1614.17 1964.32,1614.17 2011.56,1661.42 2078.74,1661.42
  other v1: 1618.11,43.31 1456.69,59.06 1771.65,59.06 1556.86,68.68 1679.36,68.68 1531.5,129.92 1704.72,129.92 1556.86,191.17 1679.36,191.17 1618.11,216.54 1366.14,1673.23 1366.14,1712.6 129.92,4240.16 3106.3,4240.16 68.68,4265.53 191.17,4265.53 3045.05,4265.53 3167.54,4265.53 43.31,4326.77 216.54,4326.77 3019.68,4326.77 3192.91,4326.77 68.68,4388.02 191.17,4388.02 3045.05,4388.02 3167.54,4388.02 129.92,4413.39 3106.3,4413.39

## Polygon pours and split planes (outlines as drawn)
AGND on Top Layer "AGND-TOP" (solid, remove dead copper, pour order 1016): 2377.61,2077.57 2377.61,1677.17 3088.3,1677.17 3088.3,2077.57
GND on Top Layer "GROUND-TOP-LAYER" (solid, remove dead copper, pour order 1017): 19.68,4132.62 298.72,4132.62 298.72,4409.45 2929.63,4409.45 2929.63,4132.62 3208.66,4132.62 3208.66,19.68 1813.48,19.68 1813.48,296.52 1414.86,296.52 1414.86,19.68 19.68,19.68
1V2 on MidLayer1 "FPGAPWR-ML1-1V2" (solid, pour order 1012): 1471.71,1858.42 1471.71,2031.95 1574.38,2031.95 1574.38,1854.79 1810.6,1854.79 1901.15,1764.24 1901.15,1524.08 2078.32,1524.08 2078.32,1425.65 1901.15,1425.65 1901.15,1189.43 1810.6,1098.88 1574.38,1098.88 1574.38,921.72 1472.02,921.72 1472.02,1098.88 1235.8,1098.88 1145.25,1189.43 1145.25,1425.65 968.08,1425.65 968.08,1528.01 1145.25,1528.01 1145.25,1772.11 1227.92,1854.79
GND on MidLayer1 "GROUND-MID1-LAYER" (solid, remove dead copper, pour order 1018): 19.68,4132.62 298.72,4132.62 298.72,4409.45 2929.63,4409.45 2929.63,4132.62 3208.66,4132.62 3208.66,19.68 1813.48,19.68 1813.48,296.52 1414.86,296.52 1414.86,19.68 19.68,19.68
1V2 on MidLayer1 "1V2-connect-to-L1-C17" (solid, remove dead copper, pour order 1014): 1893.7,1417.32 3133.86,1417.32 3133.86,2208.66 2375.98,2208.66 2375.98,1694.29 1893.7,1694.29
GND on MidLayer2 "GROUND-MID2-LAYER" (solid, remove dead copper, pour order 1019): 19.68,4132.62 298.72,4132.62 298.72,4409.45 2929.63,4409.45 2929.63,4132.62 3208.66,4132.62 3208.66,19.68 1813.48,19.68 1813.48,296.52 1414.86,296.52 1414.86,19.68 19.68,19.68
no net on MidLayer2 "VCCX" (solid, remove dead copper, pour order 1015): 2409.45,2322.83 3051.18,2322.83 3051.18,137.8 2409.45,137.8
VCCA_PLL1 on MidLayer3 "VCCA_PLL1_MID3" (solid, remove dead copper, pour order 1008): 1235,1181.1 1326.77,1181.1 1326.77,881.89 1224.41,881.89 1224.41,1181.1
VCCA_PLL3 on MidLayer3 "VCCA_PLL3_MID3" (solid, remove dead copper, pour order 1010): 1303.15,1736.22 1185.04,1736.22 1185.04,2055.12 1303.15,2055.12
GND on MidLayer3 "GROUND-MID3-LAYER" (solid, remove dead copper, pour order 1020): 19.68,4132.62 298.72,4132.62 298.72,4409.45 2929.63,4409.45 2929.63,4132.62 3208.66,4132.62 3208.66,19.68 1813.48,19.68 1813.48,296.52 1414.86,296.52 1414.86,19.68 19.68,19.68
VCCA_PLL4 on MidLayer4 "VCCA_PLL4_MID4" (solid, remove dead copper, pour order 1011): 1748.03,1181.1 1862.2,1181.1 1862.2,893.7 1751.49,893.7 1749.72,895.66 1748.03,897.53
VCCA_PLL2 on MidLayer4 "VCCA_PLL2_MID4" (solid, remove dead copper, pour order 1009): 1744.09,1736.22 1862.2,1736.22 1862.2,2062.99 1744.09,2062.99
GND on MidLayer4 "GROUND-MID4-LAYER" (solid, remove dead copper, pour order 1021): 19.68,4132.62 298.72,4132.62 298.72,4409.45 2929.63,4409.45 2929.63,4132.62 3208.66,4132.62 3208.66,19.68 1813.48,19.68 1813.48,296.52 1414.86,296.52 1414.86,19.68 19.68,19.68
1V2 on Bottom Layer "1V2-BL" (solid, remove dead copper, pour order 1000): 1433.07,2240.16 1433.07,2059.06 1602.36,2059.06 1602.36,2149.61 2559.06,2149.61 2559.06,2066.93 3070.87,2066.93 3070.87,2240.16
VCCA_PLL2 on Bottom Layer "VCCA_PLL2_BL" (solid, remove dead copper, pour order 1005): 1657.48,2145.67 1714.47,2145.67 1714.47,2065.58 1897.64,2065.58 1897.64,2023.62 1665.62,2023.62 1665.62,2057.95 1657.48,2057.95
GND on Bottom Layer "FPGAPWR-BL-GND" (solid, pour order 1001): 1417.32,1574.8 1623.11,1574.8 1623.11,1376.89 1417.32,1376.89
1V2 on Bottom Layer "FPGAPWR-BL-1V2" (solid, pour order 1002): 1224.41,1736.22 1224.41,1177.16 1818.9,1177.16 1818.9,1736.22
VCCA_PLL1 on Bottom Layer "VCCA_PLL1_BL" (solid, remove dead copper, pour order 1004): 1429.13,803.15 1429.13,933.07 1192.91,933.07 1192.91,881.89 1366.14,881.89 1366.14,803.15
VCCA_PLL4 on Bottom Layer "VCCA_PLL4_BL" (solid, remove dead copper, pour order 1007): 1901.57,932.68 1901.57,885.04 1666.7,885.04 1666.7,850.39 1618.11,850.39 1618.11,937.01 1901.57,937.01
VCCA_PLL3 on Bottom Layer "VCCA_PLL3_BL" (solid, remove dead copper, pour order 1006): 1389.76,2145.67 1334.65,2145.67 1334.65,2062.99 1157.48,2062.99 1157.48,2019.68 1381.89,2019.68 1381.89,2055.12 1389.76,2055.12
3V3 on Bottom Layer "FPGAPWR-BL-3V3" (solid, pour order 1003): 1083.33,1956.69 1979.86,1956.69 2003.88,1932.68 2003.88,1020.08 1979.86,996.06 1067.32,996.06 1043.31,1020.08 1043.31,1932.68 1067.32,1956.69
GND on Bottom Layer "GROUND-BOTTOM-LAYER" (solid, remove dead copper, pour order 1017): 19.68,4132.62 298.72,4132.62 298.72,4409.45 2929.63,4409.45 2929.63,4132.62 3208.66,4132.62 3208.66,19.68 1813.48,19.68 1813.48,296.52 1414.86,296.52 1414.86,19.68 19.68,19.68
GND on GND-Layer5 (split plane): 3216.12,4436.6 3216.12,20.1 20.1,20.1 20.1,4436.6 1523.62,4436.6
3V3 on VCC (split plane): 1523.62,4436.6 2701.84,4436.6 2701.84,4061.24 2702.17,4058.67 2703.17,4056.27 2704.74,4054.22 2720.98,4037.98 2721.87,4037.3 2723.04,4036.4 2725.43,4035.41 2728,4035.07 3041.89,4035.07 3106.07,3970.89 3106.07,2319.11 3064.6,2277.64 2921.43,2277.64 2802.3,2396.78 2800.24,2398.36 2797.84,2399.35 2795.28,2399.69 2629.92,2399.69 2627.35,2399.35 2624.96,2398.36 2622.9,2396.78 2617,2390.88 2615.42,2388.82 2614.43,2386.43 2614.09,2383.86 2614.09,2206.87 2429.99,2022.77 2428.41,2020.71 2427.42,2018.32 2427.08,2015.75 2427.08,1590.55 2427.42,1587.98 2428.41,1585.59 2429.99,1583.53 2445.74,1567.78 2447.79,1566.21 2450.19,1565.21 2452.76,1564.88 2582.68,1564.88 2585.25,1565.21 2587.64,1566.21 2589.7,1567.78 2618.29,1596.37 2712.19,1596.37 2725.07,1583.49 2725.07,1440 2725.41,1437.43 2726.4,1435.04 2727.98,1432.98 2732.98,1427.98 2735.04,1426.4 2737.43,1425.41 2740,1425.07 3005.77,1425.07 3045.19,1385.65 3045.19,1287.4 3045.19,1244.09 3045.19,795.45 2948.64,698.9 2838.58,698.9 2836.01,698.57 2833.62,697.57 2831.56,696 2780.38,644.82 2778.8,642.76 2777.81,640.36 2777.47,637.8 2777.47,523.8 2617,363.32 2615.42,361.26 2614.43,358.87 2614.09,356.3 2614.09,20.1 20.1,20.1 20.1,4436.6 1523.62,4436.6
5V0 on VCC (split plane): 3216.12,4436.6 3216.12,20.1 2633.94,20.1 2633.94,352.19 2794.42,512.67 2796,514.72 2796.99,517.12 2797.33,519.68 2797.33,633.68 2842.69,679.05 2952.76,679.05 2955.33,679.39 2957.72,680.38 2959.78,681.96 3062.14,784.32 3063.03,785.48 3063.72,786.37 3064.01,787.08 3064.71,788.77 3065.05,791.34 3065.05,1244.09 3065.05,1287.4 3065.05,1389.76 3064.71,1392.33 3063.72,1394.73 3062.82,1395.89 3062.14,1396.78 3016.9,1442.02 3014.85,1443.6 3012.45,1444.59 3009.88,1444.93 2744.93,1444.93 2744.93,1587.6 2744.59,1590.17 2743.6,1592.56 2742.02,1594.62 2723.32,1613.32 2721.26,1614.9 2718.87,1615.89 2716.3,1616.23 2614.17,1616.23 2611.6,1615.89 2609.21,1614.9 2607.15,1613.32 2578.57,1584.73 2456.87,1584.73 2446.94,1594.66 2446.94,2011.64 2631.04,2195.74 2632.61,2197.79 2633.6,2200.19 2633.94,2202.76 2633.94,2379.75 2634.03,2379.84 2791.16,2379.84 2910.3,2260.7 2911.2,2260.01 2912.36,2259.12 2914.75,2258.13 2917.32,2257.79 3068.72,2257.79 3071.29,2258.13 3073.68,2259.12 3075.74,2260.7 3123.02,2307.98 3124.6,2310.04 3125.59,2312.43 3125.93,2315 3125.93,3975 3125.59,3977.57 3124.6,3979.96 3123.7,3981.13 3123.02,3982.02 3053.02,4052.02 3050.96,4053.6 3048.57,4054.59 3046,4054.93 2732.11,4054.93 2721.69,4065.35 2721.69,4436.6

## Keep-outs
Bottom Layer:
  rectangle: 2643.7,3334.65 2840.55,3417.32
Keep-Out Layer:
  circle w15.75: c2928.82,2472.44 r118.11
  circle w15.75: c857.95,2472.44 r118.11
  circle w15.75: c306.77,2507.87 r118.11
  circle w15.75: c306.77,437.01 r118.11
  circle w15.75: c857.95,472.44 r118.11
  circle w15.75: c2928.82,472.44 r118.11
  region: 0,4456.69 0,4433.07 3236.22,4433.07 3236.22,4456.69
  rectangle: 0,0 3236.22,23.62
  rectangle: 0,0 23.62,4456.69
  region: 3236.22,4456.69 3212.6,4456.69 3212.6,0 3236.22,0
Mechanical 4:
  rectangle: 236.22,4358.27 925.2,4456.69

## Other copper
Top Layer:
  rectangle net GND: 3093.5,1773.6 3142.6,1785.4
  region net LX: 2768.7,1716.54 2645.67,1716.54 2645.67,1622.32 2768.7,1622.32
  rectangle net 5V0: 2645.67,2251.97 2740.16,2393.7
  rectangle net GND: 2645.67,2551.18 2740.16,2692.91
  rectangle net 1V2: 2850.39,2100 3027.56,2195
  rectangle net 5V0: 2881.48,1479.25 3013.03,1700.34
  rectangle net 5V0: 2824.06,1449.65 2951.2,1558.01
  rectangle net GND: 3011.8,1366.15 3031.49,1405.52
  pour cut-out: 2554.02,3195 2554.02,2865 2194.02,2865 2194.02,3195
  pour cut-out: 995.43,2007.56 2055.43,2007.56 2055.43,947.56 995.43,947.56
Bottom Layer:
  rectangle net LX: 2649.61,1614.17 2783.46,1724.41
  rectangle net 1V2: 2838.58,1964.57 3051.18,2200.79
  rectangle net 5V0: 2629.92,2248.03 2740.16,2346.46
  rectangle net 5V0: 2645.67,2248.03 2740.16,2346.46
  rectangle net 3V3: 2562.99,2570.86 2610.24,2704.72
  rectangle net 3V3: 2562.99,570.86 2610.24,704.72
  rectangle net GND: 2645.67,2598.43 2740.16,2696.85
  rectangle net 5V0: 2645.67,251.97 2740.16,346.46
  rectangle net GND: 2645.67,598.43 2740.16,696.85
  region net LX: 2455.79,1920.32 2455.79,2040.32 2305.79,2040.32 2305.79,1920.32
  rectangle net 1V2: 2641.13,1901.74 2787.4,2043.82
GND-Layer5 (plane layer: these items are gaps in the copper):
  text "GND" at 1645.67,437.01 h60
VCC (plane layer: these items are gaps in the copper):
  lines w19.68: 2624.02,0 2624.02,356.3 2787.4,519.68 2787.4,637.8 2838.58,688.98 2952.76,688.98 3055.12,791.34 3055.12,1244.09 3055.12,1287.4 3055.12,1389.76 3009.88,1435 2740,1435 2735,1440 2735,1587.6 2716.3,1606.3 2614.17,1606.3 2582.68,1574.8 2452.76,1574.8 2437.01,1590.55 2437.01,2015.75 2624.02,2202.76 2624.02,2383.86 2629.92,2389.76 2795.28,2389.76 2917.32,2267.72 3068.72,2267.72 3116,2315 3116,3975 3046,4045 2728,4045 2711.76,4061.24 2711.76,4456.69
  text "5V0" at 2791.34,1826.77 h60
  text "3V3" at 1657.48,437.01 h60